# Altium PCB MainBoardPCB_5.PcbDoc (part 8 of 35)
Units mm, origin at the board's own origin, x right, y up, seen from the top; angles counter-clockwise.
Board outline 258.95 x 308.86 mm, 16 copper layers (L1, L2 (GND), L3 (Sign), L4 (GND), L5 (Sign), L6 (PWR/GND), L7(PWR/GND), L8 (Plane_GND), L9 (PWR/GND), L10 (PWR/GND), L11 (PWR/GND), L12 (Sign), L13 (GND), L14 (Sign), L15 (GND), L16), stack 2.502 mm thick; 2361 components, 1769 nets, 8410 pads, 3285 vias.
Unrouted connection lines stored in the file: 4635.
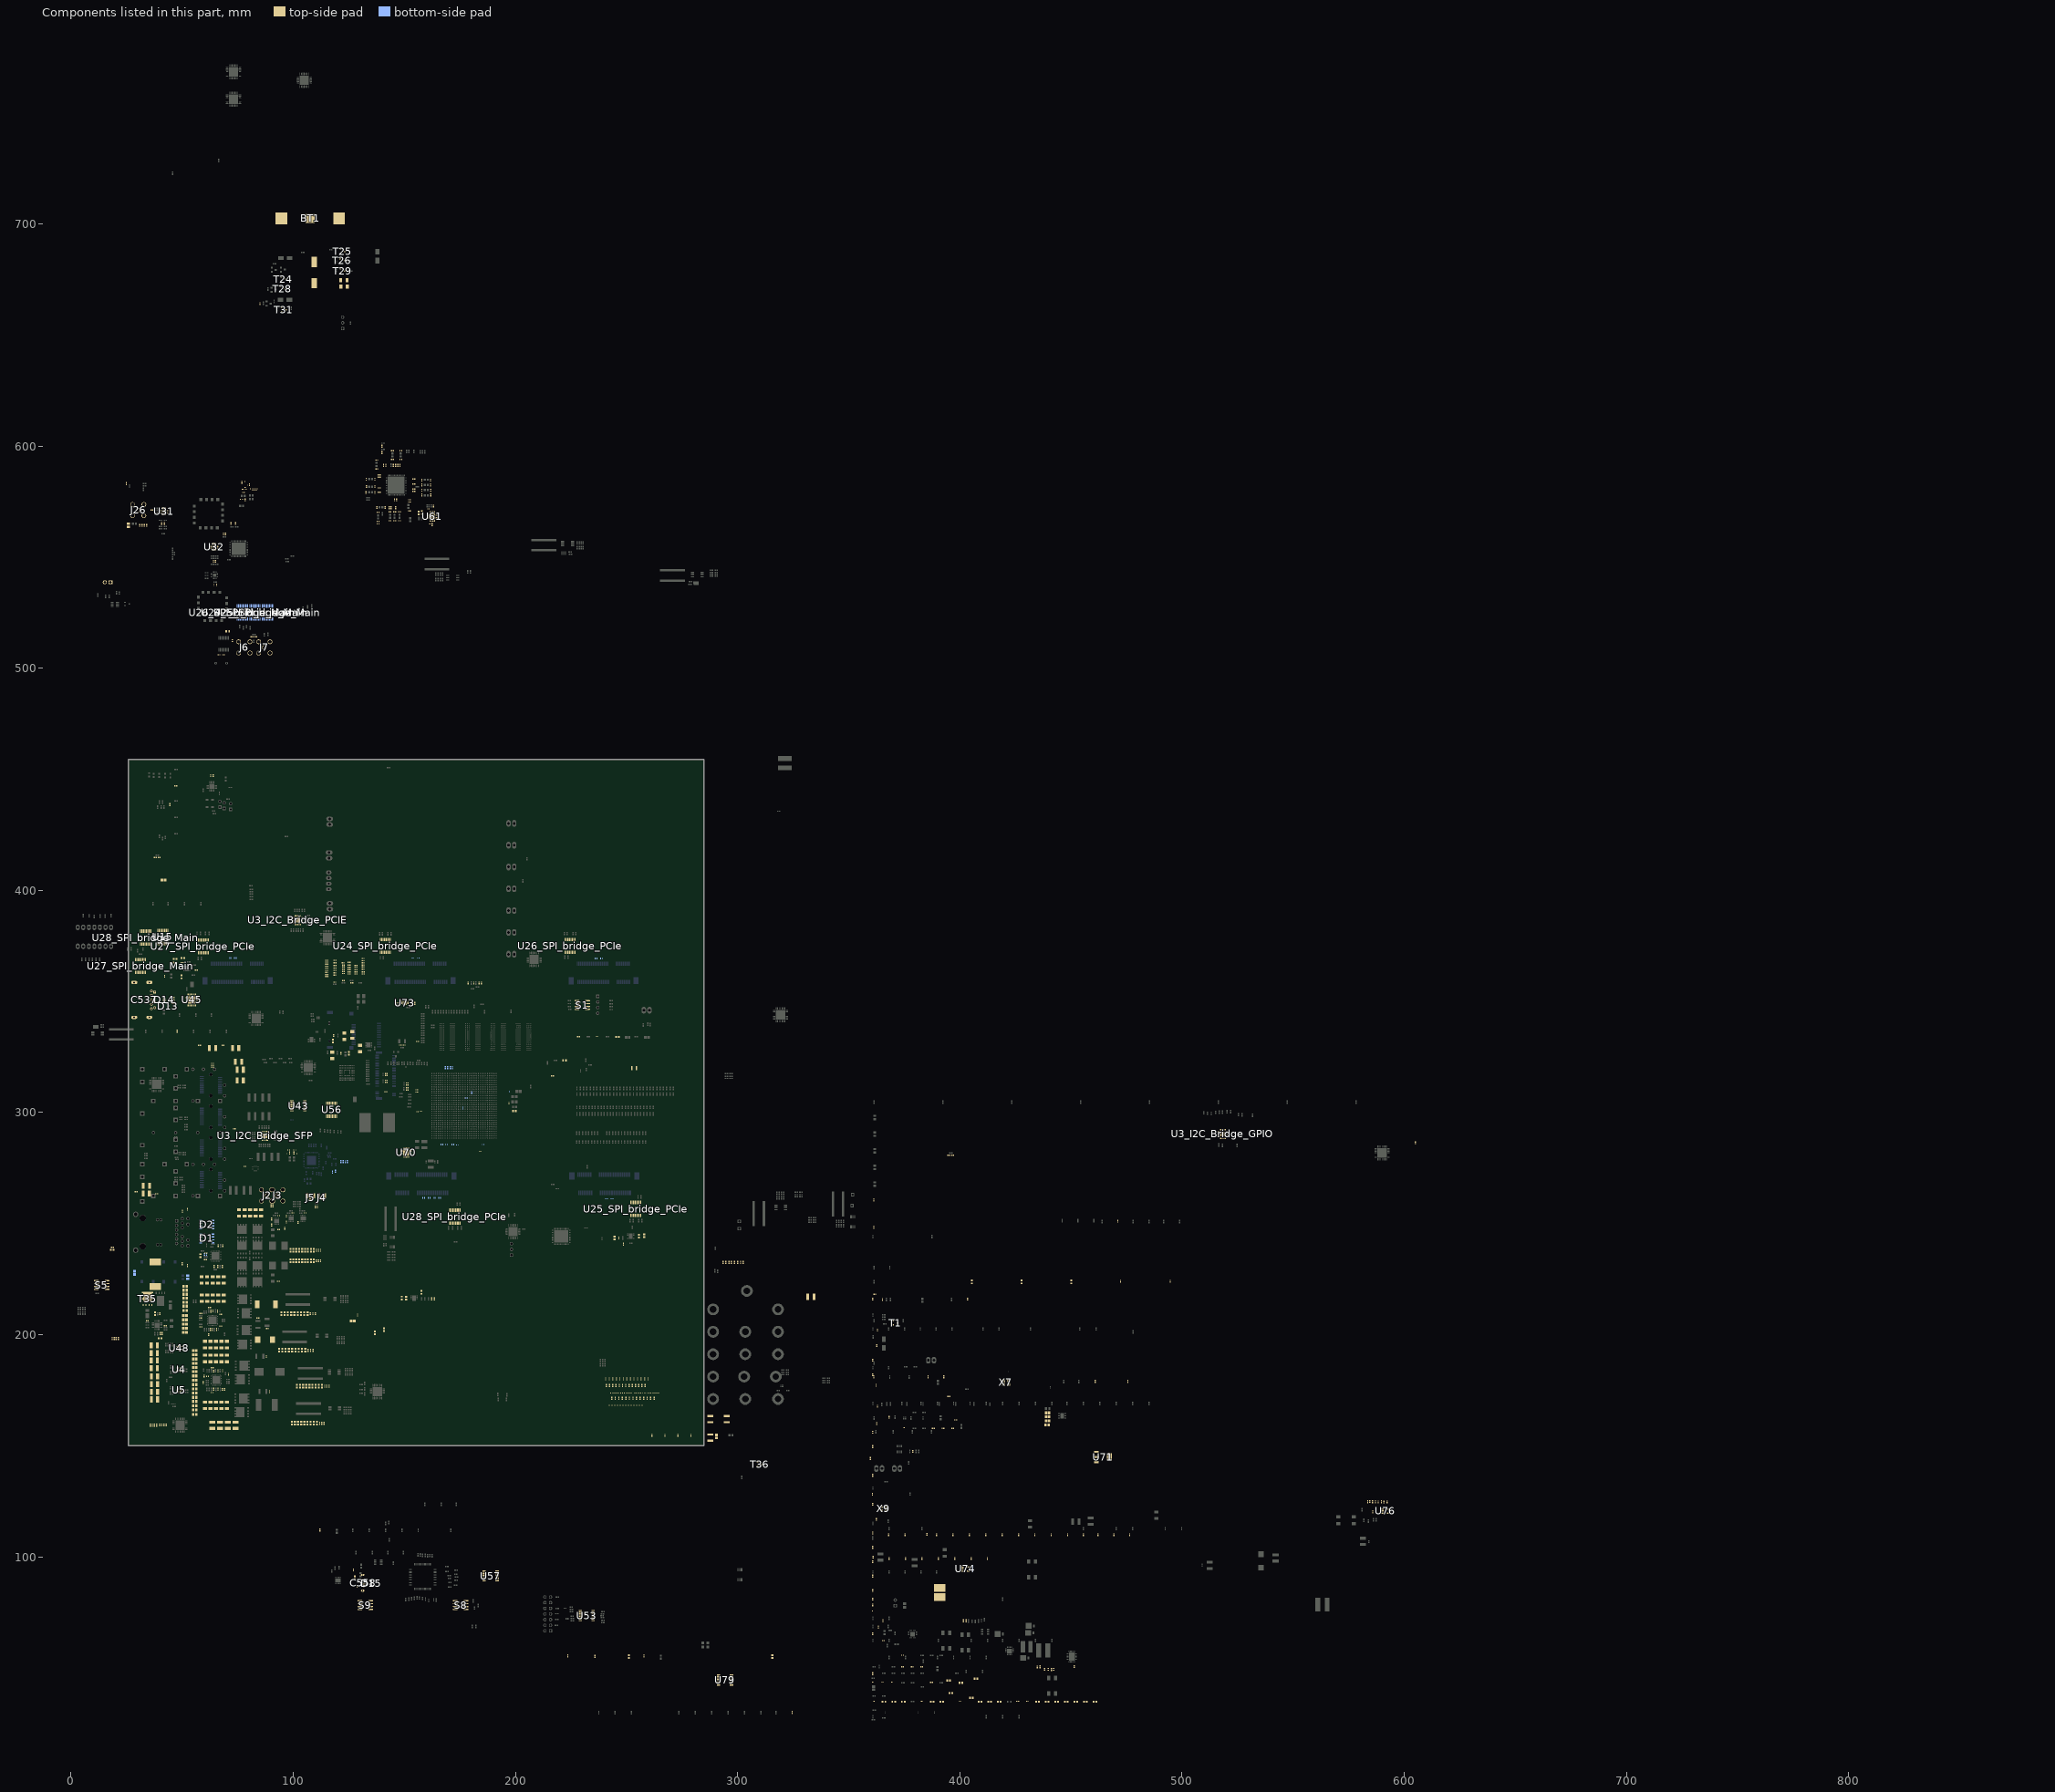
[diagram p19: the components of this part, seen from the top]

## Part data (continued)
C273 C276 C277 C278 C285 C288 C289 C290 C297 C300 C301 C302: library part Capacitor, "CAP CER 10000PF 16V X7R 0201", Dielectric=X7R, Manufacturer=Murata, Manufacturer Part Number=GRM033R71C103KE14D, Supplier Part Number 1=490-14453-1-ND, Tolerance=10%, Voltage Rating (DC)=16V, Capacitance=10nF, Category="Ceramic Capacitors", ComponentLink1Description=http://www.farnell.com/datasheets/2722745.pdf?src-supplier=Farnell, ComponentLink1URL=http://www.farnell.com/datasheets/2722745.pdf?src-supplier=Farnell, ComponentLink2Description=http://www.farnell.com/datasheets/2722745.pdf?src-supplier=Newark, ComponentLink2URL=http://www.farnell.com/datasheets/2722745.pdf?src-supplier=Newark, ComponentLink3Description=http://www.farnell.com/datasheets/2722745.pdf?src-supplier=Element14, ComponentLink3URL=http://www.farnell.com/datasheets/2722745.pdf?src-supplier=Element14, ComponentLink4Description=http://search.murata.co.jp/Ceramy/image/img/A01X/G101/ENG/GRM033R71C103KE14-01.pdf?src-supplier=Digi-Key, ComponentLink4URL=http://search.murata.co.jp/Ceramy/image/img/A01X/G101/ENG/GRM033R71C103KE14-01.pdf?src-supplier=Digi-Key, Length=600um, Pricing 1="1=0,10000, 10=0,01900, 100=0,00870, 500=0,00620, 1000=0,00487, 2500=0,00443, 5000=0,00407 (USD)", RoHS=No, Stock 1=188777, Supplier 1=Digi-Key, Thickness=300um, Width=300um
C303_I2C_Bridge_GPIO C303_I2C_Bridge_PCIE C303_I2C_Bridge_SFP C406 C418 C447 C459 C517 C519 C521 C545 C546 C547 C566_5V_to_3V3_for_FTDI C623 C649 C651 C653 C654 C677 C715 C716 C717 C718: library part Capacitor, Case/Package=0402, Case Code (Metric)=1005, Dielectric=X5R, Insulation Resistance=10GR, Manufacturer=Yageo, Manufacturer Part Number=CC0402KRX5R6BB104, Max Operating Temperature=85°C, Min Operating Temperature=-55°C, Package Quantity=1, Supplier Part Number 1=311-1336-1-ND, Tolerance=10%, Voltage Rating=10V, Capacitance=100nF, Case Code (Imperial)=0402, ComponentLink1Description=https://datasheet.ciiva.com/144/mlccorderingcode-144028.pdf?src-supplier=Digi-Key, ComponentLink1URL=https://datasheet.ciiva.com/144/mlccorderingcode-144028.pdf?src-supplier=Digi-Key, ComponentLink2Description=https://datasheet.ciiva.com/144/mlccorderingcode-144029.pdf?src-supplier=Digi-Key, ComponentLink2URL=https://datasheet.ciiva.com/144/mlccorderingcode-144029.pdf?src-supplier=Digi-Key, ComponentLink3Description=https://datasheet.ciiva.com/144/mlccorderingcode-144030.pdf?src-supplier=Digi-Key, ComponentLink3URL=https://datasheet.ciiva.com/144/mlccorderingcode-144030.pdf?src-supplier=Digi-Key, ComponentLink4Description=https://datasheet.ciiva.com/11587/upy-gphc-x5r-4v-to-50v-12-11587302.pdf?src-supplier=Avnet, ComponentLink4URL=https://datasheet.ciiva.com/11587/upy-gphc-x5r-4v-to-50v-12-11587302.pdf?src-supplier=Avnet, ComponentLink5Description=https://datasheet.ciiva.com/7978/1359354-7978091.pdf?src-supplier=Element14, ComponentLink5URL=https://datasheet.ciiva.com/7978/1359354-7978091.pdf?src-supplier=Element14, ComponentLink6Description=https://datasheet.ciiva.com/16624/upy-gphc-x5r-4v-to-50v-12-16624732.pdf?src-supplier=Avnet+Europe, ComponentLink6URL=https://datasheet.ciiva.com/16624/upy-gphc-x5r-4v-to-50v-12-16624732.pdf?src-supplier=Avnet+Europe, Depth=0.5mm, Dissipation Factor=5%, Halogen Free="Halogen Free", Height=0.5mm, Lead Free="Lead Free", Length=1mm, Mount="Surface Mount", Number of Pins=2, Packaging="Tape and Reel", Pricing 1="1 = 0,10000, 10 = 0,03000, 100 = 0,01350, 500 = 0,00966, 1000 = 0,00759, 2500 = 0,00690, 5000 = 0,00635 (USD)", Radiation Hardening=No, REACH SVHC="No SVHC", RoHS=Yes, Stock 1=8753233, Supplier 1=Digi-Key, Termination=SMD/SMT, Thickness=0.022inch, Voltage Rating (DC)=10V, Width=0.02inch
C304 C305 C306 C307: library part Capacitor, "SMT Capacitor", Part Number=CL10A475KO8NNNC, Supplier Part Number 1=1276-1784-2-ND, Parameter 1=16V, Supplier 1=Digi-Key
C308 C354 C355 C606 C607 C610 C611 C613 C614 C615 C617 C618 C619 C620 C621 C622: library part Capacitor, "SMT Capacitor", Part Number=CL10A475KQ8NNNC, Supplier Part Number 1=1276-1045-1-ND, Parameter 1=6.3V, Supplier 1=Digi-Key
C309_U_Pomiar_pradu_napiecia_1 C309_U_Pomiar_pradu_napiecia_2 C309_U_Pomiar_pradu_napiecia_3 C309_U_Pomiar_pradu_napiecia_4 C309_U_Pomiar_pradu_napiecia_5 C309_U_Pomiar_pradu_napiecia_6 C309_U_Pomiar_pradu_napiecia_7 C309_U_Pomiar_pradu_napiecia_8 C309_U_Pomiar_pradu_napiecia_9 C309_U_Pomiar_pradu_napiecia_10 C309_U_Pomiar_pradu_napiecia_11 C310 C585 C711 C712: library part Capacitor, "CAP CER 0.1UF 50V X5R 0402", Case/Package=0402, Case Code (Metric)=1005, Dielectric=X5R, Dielectric Material=Ceramic, Manufacturer=Murata, Manufacturer Part Number=GRM155R61H104KE14D, Max Operating Temperature=85°C, Min Operating Temperature=-55°C, Package Quantity=10000, Supplier Part Number 1=490-10697-1-ND, Tolerance=10%, Voltage=50V, Capacitance=100nF, Case Code (Imperial)=0402, Category="Ceramic Capacitors", ComponentLink1Description=http://www.farnell.com/datasheets/2079150.pdf?src-supplier=Farnell, ComponentLink1URL=http://www.farnell.com/datasheets/2079150.pdf?src-supplier=Farnell, ComponentLink2Description=http://www.mouser.com/ds/2/281/c02e-2905.pdf?src-supplier=Mouser, ComponentLink2URL=http://www.mouser.com/ds/2/281/c02e-2905.pdf?src-supplier=Mouser, ComponentLink3Description=http://www.farnell.com/datasheets/2079150.pdf?src-supplier=Element14, ComponentLink3URL=http://www.farnell.com/datasheets/2079150.pdf?src-supplier=Element14, ComponentLink4Description=http://search.murata.co.jp/Ceramy/image/img/A01X/G101/ENG/GRM155R61H104KE14-01.pdf?src-supplier=Digi-Key, ComponentLink4URL=http://search.murata.co.jp/Ceramy/image/img/A01X/G101/ENG/GRM155R61H104KE14-01.pdf?src-supplier=Digi-Key, Composition=Ceramic, Depth=0.5mm, Dissipation Factor=0.025%, Height=0.5mm, Lead Free="Lead Free", Length=1mm, Mount="Surface Mount", Packaging="Tape and Reel", Pricing 1="1=0,10000, 10=0,04600, 100=0,02050, 500=0,01464, 1000=0,01150, 2500=0,01045, 5000=0,00961 (USD)", REACH SVHC="No SVHC", RoHS=Yes, Stock 1=435607, Supplier 1=Digi-Key, Termination=SMD/SMT, Thickness=0.022inch, Voltage Rating=50V, Voltage Rating (DC)=50V, Weight=0.000212oz, Width=0.02inch
C311_I2C_Expander_00 C311_I2C_Expander_01 C311_I2C_Expander_02 C311_I2C_Expander_10 C311_I2C_Expander_11 C311_I2C_Expander_12 C311_I2C_Expander_16 C311_I2C_Expander_17 C311_I2C_Expander_18 C311_I2C_Expander_Main_Rst C311_I2C_Expander_PWR_CLK C311_I2C_Expander_PWR_Dist C311_I2C_Expander_SFP C544 C700 C720 C721 C722 C723: library part Capacitor, "MURATA - GRT155R61E105KE01D - SMD Multilayer Ceramic Capacitor, 1 µF, 25 V, 0402 [1005 Metric], ± 10%, X5R, GRT Series - SMD Multilayer Ceramic Capacitor, 1 µF, 25 V, 0402 [1005 Metric], ± 10%, X5R, GRT Series", Case/Package=0402, Case Code (Metric)=1005, Dielectric=X5R, Manufacturer=Murata, Manufacturer Part Number=GRT155R61E105KE01D, Max Operating Temperature=85°C, Min Operating Temperature=-55°C, Ratings=AEC-Q200, Supplier Part Number 1=490-12263-1-ND, Tolerance=10%, Voltage Rating=25V, Capacitance=1uF, Case Code (Imperial)=0402, Category="Ceramic Capacitors", ComponentLink1Description=http://www.farnell.com/datasheets/2165918.pdf?src-supplier=Farnell, ComponentLink1URL=http://www.farnell.com/datasheets/2165918.pdf?src-supplier=Farnell, ComponentLink2Description=http://search.murata.co.jp/Ceramy/image/img/A01X/G101/ENG/GRT155R61E105KE01-01.pdf?src-supplier=Digi-Key, ComponentLink2URL=http://search.murata.co.jp/Ceramy/image/img/A01X/G101/ENG/GRT155R61E105KE01-01.pdf?src-supplier=Digi-Key, ComponentLink3Description=http://www.farnell.com/datasheets/2165918.pdf?src-supplier=Element14, ComponentLink3URL=http://www.farnell.com/datasheets/2165918.pdf?src-supplier=Element14, Length=0.039inch, Mount="Surface Mount", Packaging="Tape and Reel", Pricing 1="1=0,18000, 10=0,12300, 100=0,06210, 500=0,04248, 1000=0,03758, 2500=0,03594, 5000=0,03268 (USD)", RoHS=Yes, Supplier 1=Digi-Key, Thickness=0.022inch, Voltage Rating (DC)=25V, Width=0.02inch
  C311_I2C_Expander_00 C311_I2C_Expander_01 C311_I2C_Expander_02 C311_I2C_Expander_10 C311_I2C_Expander_11 C311_I2C_Expander_12 C311_I2C_Expander_16 C311_I2C_Expander_17 C311_I2C_Expander_18 C311_I2C_Expander_Main_Rst C311_I2C_Expander_PWR_CLK C311_I2C_Expander_PWR_Dist C311_I2C_Expander_SFP C700 C720 C721 C722 C723: Stock 1=341453
  C544: Stock 1=415681
C320: library part Capacitor, Case/Package=0402, Case Code (Metric)=1005, Dielectric=X7R, Dielectric Material=Ceramic, Manufacturer=KEMET, Manufacturer Part Number=C0402C103K8RACAUTO, Max Operating Temperature=125°C, Min Operating Temperature=-55°C, Package Quantity=1, Ratings=AEC-Q200, Supplier Part Number 1=399-6827-1-ND, Tolerance=10%, Voltage Rating=10V, Capacitance=10nF, Case Code (Imperial)=0402, ComponentLink1Description=https://datasheet.ciiva.com/6255/datasheetpn-c0402c103k8racauto-6255096.pdf?src-supplier=Digi-Key, ComponentLink1URL=https://datasheet.ciiva.com/6255/datasheetpn-c0402c103k8racauto-6255096.pdf?src-supplier=Digi-Key, Length=0.039inch, Mount="Surface Mount", Packaging="Cut Tape", Pricing 1="1 = 0,10000, 10 = 0,06800, 100 = 0,03020, 500 = 0,02158, 1000 = 0,01695, 2500 = 0,01541, 5000 = 0,01418 (USD)", REACH SVHC="No SVHC", RoHS=Yes, Stock 1=59295, Supplier 1=Digi-Key, Thickness=0.022inch, Voltage Rating (DC)=10V, Width=0.02inch
C321: library part Capacitor, Case/Package=0603, Case Code (Metric)=1608, Manufacturer="Wurth Electronics", Manufacturer Part Number=885012006016, Max Operating Temperature=125°C, Min Operating Temperature=-55°C, Supplier Part Number 1=732-7759-1-ND, Tolerance=5%, Voltage Rating=10V, Capacitance=3.3nF, Case Code (Imperial)=0603, ComponentLink1Description=https://katalog.we-online.de/pbs/datasheet/885012006016.pdf?src-supplier=Digi-Key, ComponentLink1URL=https://katalog.we-online.de/pbs/datasheet/885012006016.pdf?src-supplier=Digi-Key, Length=0.063inch, Mount="Surface Mount", Packaging="Tape and Reel", Pricing 1="1 = 0,10000, 10 = 0,08500, 100 = 0,07590, 500 = 0,06712 (USD)", RoHS=Yes, Stock 1=3926, Supplier 1=Digi-Key, Thickness=0.034inch, Width=0.031inch
C322 C323: library part Capacitor, Case/Package=0402, Case Code (Metric)=1005, Dielectric=C0G, Dielectric Material=Ceramic, Manufacturer=KEMET, Manufacturer Part Number=C0402C270K5GACTU, Max Operating Temperature=125°C, Min Operating Temperature=-55°C, Package Quantity=1, Supplier Part Number 1=399-8960-1-ND, Tolerance=10%, Voltage Rating=50V, Capacitance=27pF, Case Code (Imperial)=0402, ComponentLink1Description=https://datasheet.ciiva.com/5413/kem-c1003-c0g-smd-5413929.pdf?src-supplier=Mouser, ComponentLink1URL=https://datasheet.ciiva.com/5413/kem-c1003-c0g-smd-5413929.pdf?src-supplier=Mouser, Depth=0.5mm, Height=0.5mm, Lead Free="Lead Free", Lead Pitch=0.3mm, Length=1mm, Mount="Surface Mount", Packaging="Tape and Reel", Pricing 1="1 = 0,10000, 10 = 0,02000, 100 = 0,00900, 500 = 0,00644, 1000 = 0,00506, 2500 = 0,00460, 5000 = 0,00423 (USD)", RoHS=Yes, Stock 1=1014365, Supplier 1=Digi-Key, Termination=SMD/SMT, Thickness=0.022inch, Voltage Rating (DC)=50V, Width=0.02inch
C324: library part Capacitor, Case/Package=0805, Case Code (Metric)=2012, Manufacturer=Samsung, Manufacturer Part Number=CL21A106KQCLRNC, Max Operating Temperature=85°C, Min Operating Temperature=-55°C, Package Quantity=1, Supplier Part Number 1=1276-2405-1-ND, Tolerance=10%, Voltage Rating=6.3V, Capacitance=10uF, Case Code (Imperial)=0805, ComponentLink1Description=https://datasheet.ciiva.com/25772/cl21a106kqclrnc-25772948.pdf?src-supplier=Digi-Key, ComponentLink1URL=https://datasheet.ciiva.com/25772/cl21a106kqclrnc-25772948.pdf?src-supplier=Digi-Key, Length=0.079inch, Mount="Surface Mount", Packaging="Tape and Reel", Pricing 1="1 = 0,12000, 10 = 0,08500, 100 = 0,03810, 500 = 0,02718, 1000 = 0,02136 (USD)", RoHS=Yes, Stock 1=41173, Supplier 1=Digi-Key, Thickness=0.037inch, Width=0.049inch
C325 C330 C334 C335 C342 C343: library part Capacitor, Case Code (Imperial)=0402, Case Code (Metric)=1005, Dielectric=X7R, Dielectric Material=Ceramic, Insulation Resistance=10GR, Manufacturer=Murata, Manufacturer Part Number=GRM155R71C104KA88D, Max Operating Temperature=125°C, Min Operating Temperature=-55°C, Package Quantity=1, Supplier Part Number 1=490-3261-6-ND, Tolerance=10%, Voltage=16V, Capacitance=100nF, Case/Package=0402, ComponentLink1Description=https://datasheet.ciiva.com/18102/getdatasheetpartid-85307-18102905.pdf?src-supplier=Verical, ComponentLink1URL=https://datasheet.ciiva.com/18102/getdatasheetpartid-85307-18102905.pdf?src-supplier=Verical, ComponentLink2Description=https://datasheet.ciiva.com/129/grm155r71c104ka88-01-129739.pdf?src-supplier=Digi-Key, ComponentLink2URL=https://datasheet.ciiva.com/129/grm155r71c104ka88-01-129739.pdf?src-supplier=Digi-Key, ComponentLink3Description=https://datasheet.ciiva.com/129/grm155r71c104ka88-01-129740.pdf?src-supplier=Digi-Key, ComponentLink3URL=https://datasheet.ciiva.com/129/grm155r71c104ka88-01-129740.pdf?src-supplier=Digi-Key, ComponentLink4Description=https://datasheet.ciiva.com/29199/454098-da-01-en-vs-kondensator-0402-29199799.pdf?src-supplier=Conrad, ComponentLink4URL=https://datasheet.ciiva.com/29199/454098-da-01-en-vs-kondensator-0402-29199799.pdf?src-supplier=Conrad, ComponentLink5Description=https://datasheet.ciiva.com/28534/4360-28534133.pdf?src-supplier=Element14, ComponentLink5URL=https://datasheet.ciiva.com/28534/4360-28534133.pdf?src-supplier=Element14, ComponentLink6Description=https://datasheet.ciiva.com/14103/grmseries-highdielectrictype-eng-14103750.pdf?src-supplier=Distrelec, ComponentLink6URL=https://datasheet.ciiva.com/14103/grmseries-highdielectrictype-eng-14103750.pdf?src-supplier=Distrelec, ComponentLink7Description=https://datasheet.ciiva.com/16199/product-16199000.pdf?src-supplier=Future+Electronics, ComponentLink7URL=https://datasheet.ciiva.com/16199/product-16199000.pdf?src-supplier=Future+Electronics, ComponentLink8Description=https://datasheet.ciiva.com/14116/grmseries-highdielectrictype-eng-14116878.pdf?src-supplier=Distrelec, ComponentLink8URL=https://datasheet.ciiva.com/14116/grmseries-highdielectrictype-eng-14116878.pdf?src-supplier=Distrelec, ComponentLink9Description=https://datasheet.ciiva.com/7937/4360-7937615.pdf?src-supplier=Element14, ComponentLink9URL=https://datasheet.ciiva.com/7937/4360-7937615.pdf?src-supplier=Element14, ComponentLink10Description=https://datasheet.ciiva.com/28534/4360-28534127.pdf?src-supplier=Element14, ComponentLink10URL=https://datasheet.ciiva.com/28534/4360-28534127.pdf?src-supplier=Element14, Depth=0.5mm, Height=0.5mm, Lead Free="Lead Free", Length=1mm, Material=Ceramic, Mount="Surface Mount", Number of Pins=2, Packaging="Tape and Reel", Pricing 1="1 = 0,10000, 10 = 0,03300, 100 = 0,01470, 500 = 0,01046, 1000 = 0,00822, 2500 = 0,00748, 5000 = 0,00688 (USD)", Radiation Hardening=No, REACH SVHC="No SVHC", RoHS=Yes, Stock 1=141102188, Supplier 1=Digi-Key, Termination=SMD/SMT, Thickness=0.022inch, Voltage Rating=16V, Voltage Rating (DC)=16V, Width=0.5mm
C326 C327 C328 C329: library part Capacitor, Case/Package=0402, Dielectric=X5R, Dielectric Material=Ceramic, Manufacturer=KEMET, Manufacturer Part Number=C0402C105K9PACTU, Max Operating Temperature=85°C, Min Operating Temperature=-55°C, Package Quantity=1, Supplier Part Number 1=399-4873-6-ND, Tolerance=10%, Voltage=6.3V, Capacitance=1uF, Case Code (Imperial)=0402, ComponentLink1Description=https://datasheet.ciiva.com/28645/1789732-28645392.pdf?src-supplier=Element14, ComponentLink1URL=https://datasheet.ciiva.com/28645/1789732-28645392.pdf?src-supplier=Element14, ComponentLink2Description=https://datasheet.ciiva.com/11786/0900766b8116eb59-11786028.pdf?src-supplier=RSComponents, ComponentLink2URL=https://datasheet.ciiva.com/11786/0900766b8116eb59-11786028.pdf?src-supplier=RSComponents, ComponentLink3Description=https://datasheet.ciiva.com/7747/kem-c1006-x5r-smd-7747445.pdf?src-supplier=Element14, ComponentLink3URL=https://datasheet.ciiva.com/7747/kem-c1006-x5r-smd-7747445.pdf?src-supplier=Element14, ComponentLink4Description=https://datasheet.ciiva.com/7747/40889-7747623.pdf?src-supplier=Element14, ComponentLink4URL=https://datasheet.ciiva.com/7747/40889-7747623.pdf?src-supplier=Element14, ComponentLink5Description=https://datasheet.ciiva.com/18192/getdatasheetpartid-127800-18192427.pdf?src-supplier=Verical, ComponentLink5URL=https://datasheet.ciiva.com/18192/getdatasheetpartid-127800-18192427.pdf?src-supplier=Verical, Depth=0.5mm, Height=0.5mm, Lead Free="Lead Free", Lead Pitch=0.3mm, Length=1mm, Mount="Surface Mount", Number of Pins=2, Packaging="Tape and Reel", Pricing 1="1 = 0,10000, 10 = 0,02600, 100 = 0,01180, 500 = 0,00844, 1000 = 0,00662, 2500 = 0,00602, 5000 = 0,00554 (USD)", Radiation Hardening=No, REACH SVHC="No SVHC", RoHS=Yes, Stock 1=1776522, Supplier 1=Digi-Key, Termination=SMD/SMT, Thickness=0.022inch, Voltage Rating=6.3V, Voltage Rating (DC)=6.3V, Width=0.02inch
C331 C332 C395 C398 C408 C420 C436 C439 C449 C461 C522 C538 C559 C733 C734: library part Capacitor, Case/Package=0402, Case Code (Metric)=1005, Dielectric=X5R, Manufacturer=Yageo, Manufacturer Part Number=CC0402KRX5R6BB105, Max Operating Temperature=85°C, Min Operating Temperature=-55°C, Package Quantity=1, Supplier Part Number 1=311-1439-1-ND, Tolerance=10%, Voltage Rating=10V, Capacitance=1uF, Case Code (Imperial)=0402, ComponentLink1Description=https://datasheet.ciiva.com/176/upy-gphc-x5r-4v-to-50v-12-176704.pdf?src-supplier=Digi-Key, ComponentLink1URL=https://datasheet.ciiva.com/176/upy-gphc-x5r-4v-to-50v-12-176704.pdf?src-supplier=Digi-Key, ComponentLink2Description=https://datasheet.ciiva.com/176/mlccorderingcode-176705.pdf?src-supplier=Digi-Key, ComponentLink2URL=https://datasheet.ciiva.com/176/mlccorderingcode-176705.pdf?src-supplier=Digi-Key, ComponentLink3Description=https://datasheet.ciiva.com/176/mlccorderingcode-176706.pdf?src-supplier=Digi-Key, ComponentLink3URL=https://datasheet.ciiva.com/176/mlccorderingcode-176706.pdf?src-supplier=Digi-Key, Composition=Ceramic, Depth=0.5mm, Dissipation Factor=15%, Halogen Free="Halogen Free", Height=0.5mm, Lead Free="Lead Free", Length=1mm, Mount="Surface Mount", Number of Pins=2, Packaging="Tape and Reel", Pricing 1="1 = 0,10000, 10 = 0,06300, 100 = 0,02790, 500 = 0,01996, 1000 = 0,01568, 2500 = 0,01425, 5000 = 0,01311 (USD)", Radiation Hardening=No, REACH SVHC="No SVHC", RoHS=Yes, Stock 1=6046339, Supplier 1=Digi-Key, Termination=SMD/SMT, Thickness=0.022inch, Voltage Rating (DC)=10V, Width=0.02inch
C339: library part Capacitor, Case Code (Imperial)=0805, Case Code (Metric)=2012, Manufacturer=Samsung, Manufacturer Part Number=CL21A106KQCLRNC, Max Operating Temperature=85°C, Min Operating Temperature=-55°C, Package Quantity=1, Supplier Part Number 1=1276-2405-1-ND, Tolerance=10%, Voltage Rating=6.3V, Capacitance=10uF, Case/Package=0805, ComponentLink1Description=https://datasheet.ciiva.com/25772/cl21a106kqclrnc-25772948.pdf?src-supplier=Digi-Key, ComponentLink1URL=https://datasheet.ciiva.com/25772/cl21a106kqclrnc-25772948.pdf?src-supplier=Digi-Key, Length=0.079inch, Mount="Surface Mount", Packaging="Tape and Reel", Pricing 1="1 = 0,12000, 10 = 0,08500, 100 = 0,03810, 500 = 0,02718, 1000 = 0,02136 (USD)", RoHS=Yes, Stock 1=41173, Supplier 1=Digi-Key, Thickness=0.037inch, Width=0.049inch
C345 C349 C535 C536: library part Capacitor, Case Code (Imperial)=0402, Case Code (Metric)=1005, Dielectric=C0G, Manufacturer="Kyocera AVX", Manufacturer Part Number=04025A220JAT2A, Max Operating Temperature=125°C, Min Operating Temperature=-55°C, Package Quantity=1, Supplier Part Number 1=478-1074-1-ND, Temperature Coefficient=30ppm/°C, Tolerance=5%, Voltage=50V, Capacitance=22pF, Case/Package=0402, ComponentLink1Description=https://datasheet.ciiva.com/11787/0900766b80def0e2-11787300.pdf?src-supplier=RSComponents, ComponentLink1URL=https://datasheet.ciiva.com/11787/0900766b80def0e2-11787300.pdf?src-supplier=RSComponents, ComponentLink2Description=https://datasheet.ciiva.com/39121/2009578-39121644.pdf?src-supplier=Jameco, ComponentLink2URL=https://datasheet.ciiva.com/39121/2009578-39121644.pdf?src-supplier=Jameco, ComponentLink3Description=https://datasheet.ciiva.com/1123/ccog-1123585.pdf?src-supplier=Element14, ComponentLink3URL=https://datasheet.ciiva.com/1123/ccog-1123585.pdf?src-supplier=Element14, ComponentLink4Description=https://datasheet.ciiva.com/1123/ccog-1123586.pdf?src-supplier=Element14, ComponentLink4URL=https://datasheet.ciiva.com/1123/ccog-1123586.pdf?src-supplier=Element14, ComponentLink5Description=https://datasheet.ciiva.com/150/ccog-150515.pdf?src-supplier=Digi-Key, ComponentLink5URL=https://datasheet.ciiva.com/150/ccog-150515.pdf?src-supplier=Digi-Key, ComponentLink6Description=https://datasheet.ciiva.com/150/ccog-150516.pdf?src-supplier=Digi-Key, ComponentLink6URL=https://datasheet.ciiva.com/150/ccog-150516.pdf?src-supplier=Digi-Key, ComponentLink7Description=https://datasheet.ciiva.com/150/ccog-150517.pdf?src-supplier=Digi-Key, ComponentLink7URL=https://datasheet.ciiva.com/150/ccog-150517.pdf?src-supplier=Digi-Key, ComponentLink8Description=https://datasheet.ciiva.com/2987/ccog-2987653.pdf?src-supplier=Avnet, ComponentLink8URL=https://datasheet.ciiva.com/2987/ccog-2987653.pdf?src-supplier=Avnet, ComponentLink9Description=https://datasheet.ciiva.com/2987/ccog-2987654.pdf?src-supplier=Avnet, ComponentLink9URL=https://datasheet.ciiva.com/2987/ccog-2987654.pdf?src-supplier=Avnet, ComponentLink10Description=https://datasheet.ciiva.com/5423/ccog-243403-5423927.pdf?src-supplier=Mouser, ComponentLink10URL=https://datasheet.ciiva.com/5423/ccog-243403-5423927.pdf?src-supplier=Mouser, ComponentLink11Description=https://datasheet.ciiva.com/16218/ccog-16218185.pdf?src-supplier=Future+Electronics, ComponentLink11URL=https://datasheet.ciiva.com/16218/ccog-16218185.pdf?src-supplier=Future+Electronics, ComponentLink12Description=https://datasheet.ciiva.com/28592/759117-28592746.pdf?src-supplier=Element14, ComponentLink12URL=https://datasheet.ciiva.com/28592/759117-28592746.pdf?src-supplier=Element14, ComponentLink13Description=https://datasheet.ciiva.com/15165/getdatasheetpartid-38041-15165131.pdf?src-supplier=Verical, ComponentLink13URL=https://datasheet.ciiva.com/15165/getdatasheetpartid-38041-15165131.pdf?src-supplier=Verical, Contact Plating=Tin,Matte, Depth=0.5mm, Height=0.5mm, Lead Free="Lead Free", Length=1mm, Mount="Surface Mount", Number of Pins=2, Packaging="Tape and Reel", Pricing 1="1 = 0,10000, 10 = 0,03500, 100 = 0,01550, 500 = 0,01108, 1000 = 0,00871, 2500 = 0,00792, 5000 = 0,00729 (USD)", Radiation Hardening=No, REACH SVHC="No SVHC", RoHS=Yes, Stock 1=1489814, Supplier 1=Digi-Key, Termination=SMD/SMT, Thickness=0.022inch, Voltage Rating=50V, Voltage Rating (DC)=50V, Width=0.02inch
C346 C350 C713: library part Capacitor, Case Code (Imperial)=0402, Case Code (Metric)=1005, Dielectric=X5R, Manufacturer=Multicomp, Manufacturer Part Number=MC0402X104K160CT, Max Operating Temperature=85°C, Min Operating Temperature=-55°C, Supplier Part Number 1=2310529, Tolerance=10%, Voltage Rating=16V, Capacitance=100nF, Case/Package=0402, ComponentLink1Description=https://datasheet.ciiva.com/22648/1901289-22648380.pdf?src-supplier=Element14, ComponentLink1URL=https://datasheet.ciiva.com/22648/1901289-22648380.pdf?src-supplier=Element14, ComponentLink2Description=https://datasheet.ciiva.com/22648/1901289-22648381.pdf?src-supplier=Element14, ComponentLink2URL=https://datasheet.ciiva.com/22648/1901289-22648381.pdf?src-supplier=Element14, ComponentLink3Description=https://datasheet.ciiva.com/22686/1901289-22686271.pdf?src-supplier=Element14, ComponentLink3URL=https://datasheet.ciiva.com/22686/1901289-22686271.pdf?src-supplier=Element14, Number of Pins=2, Packaging="Cut Tape", REACH SVHC=Unknown, RoHS=Yes, Stock 1=510000, Supplier 1=Farnell, Voltage Rating (DC)=16V
C347 C348 C352 C353 C391 C392 C396 C397 C432 C433 C437 C438: library part Capacitor, Case/Package=1206, Case Code (Metric)=3216, Dielectric=X7R, Manufacturer 1=Murata, Manufacturer Part Number 1=GRM31CR71E106MA12L, Max Operating Temperature=125°C, Min Operating Temperature=-55°C, Package Quantity=1, Supplier Part Number 1=490-6519-1-ND, Tolerance=20%, Voltage=25V, Capacitance=10uF, Case Code (Imperial)=1206, ComponentLink1Description=https://datasheet.ciiva.com/11607/product-11607561.pdf?src-supplier=Avnet, ComponentLink1URL=https://datasheet.ciiva.com/11607/product-11607561.pdf?src-supplier=Avnet, ComponentLink2Description=https://datasheet.ciiva.com/5412/product-5412861.pdf?src-supplier=Mouser, ComponentLink2URL=https://datasheet.ciiva.com/5412/product-5412861.pdf?src-supplier=Mouser, ComponentLink3Description=https://datasheet.ciiva.com/6264/partnumbering-e-01-6264463.pdf?src-supplier=Digi-Key, ComponentLink3URL=https://datasheet.ciiva.com/6264/partnumbering-e-01-6264463.pdf?src-supplier=Digi-Key, Depth=1.6mm, Height=1.6mm, Lead Free="Lead Free", Length=3.2mm, Mount="Surface Mount", Packaging="Tape and Reel", Pricing 1="1=0,79000, 10=0,59800, 100=0,42750, 500=0,33098, 1000=0,28501 (USD)", Radiation Hardening=No, REACH SVHC="No SVHC", RoHS=Yes, Stock 1=9864, Supplier 1=Digi-Key, Termination=SMD/SMT, Thickness=0.071inch, Voltage Rating=25V, Voltage Rating (DC)=25V, Width=0.063inch
C351 C356 C361 C379 C680: library part Capacitor, Case Code (Imperial)=0402, Case Code (Metric)=1005, Dielectric=X5R, Manufacturer=Yageo, Manufacturer Part Number=CC0402KRX5R6BB105, Max Operating Temperature=85°C, Min Operating Temperature=-55°C, Package Quantity=1, Supplier Part Number 1=311-1439-1-ND, Tolerance=10%, Voltage Rating=10V, Capacitance=1uF, Case/Package=0402, ComponentLink1Description=https://datasheet.ciiva.com/176/upy-gphc-x5r-4v-to-50v-12-176704.pdf?src-supplier=Digi-Key, ComponentLink1URL=https://datasheet.ciiva.com/176/upy-gphc-x5r-4v-to-50v-12-176704.pdf?src-supplier=Digi-Key, ComponentLink2Description=https://datasheet.ciiva.com/176/mlccorderingcode-176705.pdf?src-supplier=Digi-Key, ComponentLink2URL=https://datasheet.ciiva.com/176/mlccorderingcode-176705.pdf?src-supplier=Digi-Key, ComponentLink3Description=https://datasheet.ciiva.com/176/mlccorderingcode-176706.pdf?src-supplier=Digi-Key, ComponentLink3URL=https://datasheet.ciiva.com/176/mlccorderingcode-176706.pdf?src-supplier=Digi-Key, Composition=Ceramic, Depth=0.5mm, Dissipation Factor=15%, Halogen Free="Halogen Free", Height=0.5mm, Lead Free="Lead Free", Length=1mm, Mount="Surface Mount", Number of Pins=2, Packaging="Tape and Reel", Pricing 1="1 = 0,10000, 10 = 0,06300, 100 = 0,02790, 500 = 0,01996, 1000 = 0,01568, 2500 = 0,01425, 5000 = 0,01311 (USD)", Radiation Hardening=No, REACH SVHC="No SVHC", RoHS=Yes, Stock 1=6046339, Supplier 1=Digi-Key, Termination=SMD/SMT, Thickness=0.022inch, Voltage Rating (DC)=10V, Width=0.02inch
C357 C399 C440: library part Capacitor, Case/Package=0402, Case Code (Metric)=1005, Dielectric=X5R, Dielectric Material=Ceramic, Manufacturer 1=KEMET, Manufacturer Part Number 1=C0402C104M8PACTU, Max Operating Temperature=85°C, Min Operating Temperature=-55°C, Package Quantity=1, Supplier Part Number 1=399-7764-1-ND, Tolerance=20%, Voltage=10V, Capacitance=100nF, Case Code (Imperial)=0402, ComponentLink1Description=https://datasheet.ciiva.com/5416/kem-c1006-x5r-smd-5416719.pdf?src-supplier=Mouser, ComponentLink1URL=https://datasheet.ciiva.com/5416/kem-c1006-x5r-smd-5416719.pdf?src-supplier=Mouser, Depth=0.5mm, Dissipation Factor=5%, Height=0.5mm, Lead Free="Lead Free", Lead Pitch=0.3mm, Length=1mm, Mount="Surface Mount,PCB", Number of Pins=2, Packaging="Tape and Reel", Pricing 1="1=0,10000, 10=0,02800, 100=0,01240, 500=0,00886, 1000=0,00696, 2500=0,00632, 5000=0,00582 (USD)", REACH SVHC="No SVHC", RoHS=Yes, Stock 1=344454, Supplier 1=Digi-Key, Termination=SMD/SMT, Thickness=0.022inch, Voltage Rating=10V, Voltage Rating (DC)=10V, Width=0.02inch
C358: library part Capacitor, "Cap Ceramic 1uF 10V X5R 10% SMD 0603 85C Paper T/R", Case Code (Imperial)=0603, Case Code (Metric)=1608, Dielectric=X5R, Manufacturer=Samsung, Manufacturer Part Number=CL10A105KP8NNNC, Max Operating Temperature=85°C, Min Operating Temperature=-55°C, Package Quantity=1, Supplier Part Number 1=1276-1182-1-ND, Tolerance=10%, Voltage=10V, Capacitance=1uF, Case/Package=0603, Category="Ceramic Capacitors", ComponentLink1Description=https://datasheet.ciiva.com/15195/getdatasheetpartid-358616-15195708.pdf?src-supplier=Verical, ComponentLink1URL=https://datasheet.ciiva.com/15195/getdatasheetpartid-358616-15195708.pdf?src-supplier=Verical, ComponentLink2Description=https://datasheet.ciiva.com/16358/cl05b104kq5nnnc-16358431.pdf?src-supplier=Future+Electronics, ComponentLink2URL=https://datasheet.ciiva.com/16358/cl05b104kq5nnnc-16358431.pdf?src-supplier=Future+Electronics, Contact Plating=Tin, Depth=0.8mm, Height=0.8mm, Length=1.6mm, Mount="Surface Mount", Packaging="Tape and Reel", Pricing 1="1=0,10000, 10=0,03600, 100=0,01610, 500=0,01152, 1000=0,00905 (USD)", Radiation Hardening=No, RoHS=Yes, Stock 1=3646234, Supplier 1=Digi-Key, Thickness=0.035inch, Voltage Rating=10V, Width=0.031inch
C360 C378: library part Capacitor, Case Code (Imperial)=0402, Case Code (Metric)=1005, Dielectric=X5R, Manufacturer=Samsung, Manufacturer Part Number=CL05A474KP5NNNC, Max Operating Temperature=85°C, Min Operating Temperature=-55°C, Supplier Part Number 1=1276-1173-1-ND, Tolerance=10%, Voltage Rating=10V, Capacitance=470nF, Case/Package=0402, ComponentLink1Description=https://datasheet.ciiva.com/25710/cl05a474kp5nnnc-25710324.pdf?src-supplier=Digi-Key, ComponentLink1URL=https://datasheet.ciiva.com/25710/cl05a474kp5nnnc-25710324.pdf?src-supplier=Digi-Key, ComponentLink2Description=https://datasheet.ciiva.com/26838/getdatasheetpartid-355286-26838191.pdf?src-supplier=Verical, ComponentLink2URL=https://datasheet.ciiva.com/26838/getdatasheetpartid-355286-26838191.pdf?src-supplier=Verical, ComponentLink3Description=https://datasheet.ciiva.com/16437/cl05b104kq5nnnc-16437351.pdf?src-supplier=Future+Electronics, ComponentLink3URL=https://datasheet.ciiva.com/16437/cl05b104kq5nnnc-16437351.pdf?src-supplier=Future+Electronics, Depth=0.5mm, Height=0.5mm, Lead Free="Lead Free", Length=1mm, Mount="Surface Mount", Packaging="Tape and Reel", Pricing 1="1 = 0,10000, 10 = 0,07000, 100 = 0,03140, 500 = 0,02240, 1000 = 0,01761, 2500 = 0,01600, 5000 = 0,01472 (USD)", Radiation Hardening=No, RoHS=Yes, Stock 1=941442, Supplier 1=Digi-Key, Thickness=0.022inch, Voltage Rating (DC)=10V, Width=0.02inch
C362 C380 C563_U_5V_to_3V31 C563_U_5V_to_3V32 C563_U_5V_to_3V33 C564_U_5V_to_3V31 C564_U_5V_to_3V32 C564_U_5V_to_3V33 C565_U_5V_to_3V31 C565_U_5V_to_3V32 C565_U_5V_to_3V33: library part Capacitor, Case Code (Imperial)=0603, Case Code (Metric)=1608, Dielectric=X5R, Manufacturer=Samsung, Manufacturer Part Number=CL10A475KP8NNNC, Max Operating Temperature=85°C, Min Operating Temperature=-55°C, Package Quantity=1, Supplier Part Number 1=1276-1044-1-ND, Tolerance=10%, Voltage Rating=10V, Capacitance=4.7uF, Case/Package=0603, ComponentLink1Description=https://datasheet.ciiva.com/25797/cl10a475kp8nnnc-25797520.pdf?src-supplier=Digi-Key, ComponentLink1URL=https://datasheet.ciiva.com/25797/cl10a475kp8nnnc-25797520.pdf?src-supplier=Digi-Key, ComponentLink2Description=https://datasheet.ciiva.com/26838/getdatasheetpartid-358676-26838384.pdf?src-supplier=Verical, ComponentLink2URL=https://datasheet.ciiva.com/26838/getdatasheetpartid-358676-26838384.pdf?src-supplier=Verical, ComponentLink3Description=https://datasheet.ciiva.com/16318/cl05b104kq5nnnc-16318245.pdf?src-supplier=Future+Electronics, ComponentLink3URL=https://datasheet.ciiva.com/16318/cl05b104kq5nnnc-16318245.pdf?src-supplier=Future+Electronics, Contact Plating=Tin, Depth=0.8mm, Height=0.8mm, Length=1.6mm, Mount="Surface Mount", Packaging="Tape and Reel", Pricing 1="1 = 0,13000, 10 = 0,09600, 100 = 0,04520, 500 = 0,03168, 1000 = 0,02622 (USD)", Radiation Hardening=No, RoHS=Yes, Stock 1=2124648, Supplier 1=Digi-Key, Thickness=0.035inch, Width=0.031inch
C363 C365 C367 C369 C381 C383 C385 C387 C572 C576 C598 C631: library part Capacitor, Case Code (Imperial)=0603, Case Code (Metric)=1608, Dielectric=X5R, Manufacturer=Murata, Manufacturer Part Number=GRM188R61A106KE69D, Max Operating Temperature=85°C, Min Operating Temperature=-55°C, Supplier Part Number 1=490-10474-1-ND, Tolerance=10%, Voltage=10V, Capacitance=10uF, Case/Package=0603, ComponentLink1Description=http://components.arrow.com/part/dataview/0323_07281717?src-supplier=Arrow+Europe, ComponentLink1URL=http://components.arrow.com/part/dataview/0323_07281717?src-supplier=Arrow+Europe, ComponentLink2Description=http://www.farnell.com/datasheets/1955682.pdf?src-supplier=Farnell, ComponentLink2URL=http://www.farnell.com/datasheets/1955682.pdf?src-supplier=Farnell, ComponentLink3Description=http://www.mouser.com/ds/2/281/c02e-2905.pdf?src-supplier=Mouser, ComponentLink3URL=http://www.mouser.com/ds/2/281/c02e-2905.pdf?src-supplier=Mouser, ComponentLink4Description=http://search.murata.co.jp/Ceramy/image/img/A01X/G101/ENG/GRM188R61A106KE69-01.pdf?src-supplier=Digi-Key, ComponentLink4URL=http://search.murata.co.jp/Ceramy/image/img/A01X/G101/ENG/GRM188R61A106KE69-01.pdf?src-supplier=Digi-Key, ComponentLink5Description=http://www.farnell.com/datasheets/1955682.pdf?src-supplier=Element14, ComponentLink5URL=http://www.farnell.com/datasheets/1955682.pdf?src-supplier=Element14, ComponentLink6Description=http://www.farnell.com/datasheets/1955682.pdf?src-supplier=Newark, ComponentLink6URL=http://www.farnell.com/datasheets/1955682.pdf?src-supplier=Newark, ComponentLink7Description=http://psearch.en.murata.com/capacitor/product/GRM188R61A106KE69%23.pdf?src-supplier=Avnet, ComponentLink7URL=http://psearch.en.murata.com/capacitor/product/GRM188R61A106KE69%23.pdf?src-supplier=Avnet, Depth=0.8mm, Height=0.8mm, Lead Free="Lead Free", Length=1.6mm, Mount="Surface Mount", Packaging="Tape and Reel", Pricing 1="1 = 0,21000, 10 = 0,14000, 100 = 0,07110, 500 = 0,04864, 1000 = 0,04303 (USD)", REACH SVHC="No SVHC", RoHS=Yes, Stock 1=4597169, Supplier 1=Digi-Key, Thickness=0.037inch, Voltage Rating=10V, Voltage Rating (DC)=10V, Width=0.031inch
C364 C366 C368 C370 C382 C384 C386 C388: library part Capacitor, Case Code (Imperial)=0603, Case Code (Metric)=1608, Dielectric=X5R, Manufacturer=Murata, Manufacturer Part Number=GRM188R61A226ME15D, Max Operating Temperature=85°C, Min Operating Temperature=-55°C, Package Quantity=4000, Supplier Part Number 1=490-10476-1-ND, Tolerance=20%, Voltage Rating=10V, Capacitance=22uF, Case/Package=0603, ComponentLink1Description=https://datasheet.ciiva.com/46444/1769893-46444975.pdf?src-supplier=Element14, ComponentLink1URL=https://datasheet.ciiva.com/46444/1769893-46444975.pdf?src-supplier=Element14, Depth=0.8mm, Height=0.8mm, Lead Free="Lead Free", Length=1.6mm, Material=Ceramic, Mount="Surface Mount", Packaging="Tape and Reel", Pricing 1="1 = 0,31000, 10 = 0,21500, 100 = 0,12160, 500 = 0,08584, 1000 = 0,07512 (USD)", REACH SVHC="No SVHC", RoHS=Yes, Stock 1=1768748, Supplier 1=Digi-Key, Termination=SMD/SMT, Thickness=0.039inch, Voltage Rating (DC)=10V, Weight=0.000222oz, Width=0.8mm
C371 C372 C373 C374 C375 C376: library part Capacitor, "Cap Ceramic 10uF 25V X5R 10% SMD 1206 85C Embossed T/R", Case Code (Imperial)=1206, Case Code (Metric)=3216, Dielectric=X5R, Manufacturer=Samsung, Manufacturer Part Number=CL31A106KAHNNNE, Max Operating Temperature=85°C, Min Operating Temperature=-55°C, Supplier Part Number 1=1276-1075-1-ND, Tolerance=10%, Voltage=25V, Capacitance=10uF, Case/Package=1206, Category="Ceramic Capacitors", ComponentLink1Description=https://datasheet.ciiva.com/25710/cl31a106kahnnne-25710837.pdf?src-supplier=Digi-Key, ComponentLink1URL=https://datasheet.ciiva.com/25710/cl31a106kahnnne-25710837.pdf?src-supplier=Digi-Key, ComponentLink2Description=https://datasheet.ciiva.com/15195/getdatasheetpartid-355210-15195990.pdf?src-supplier=Verical, ComponentLink2URL=https://datasheet.ciiva.com/15195/getdatasheetpartid-355210-15195990.pdf?src-supplier=Verical, ComponentLink3Description=https://datasheet.ciiva.com/29201/452519-da-01-en-vs-kondensator-1206-29201124.pdf?src-supplier=Conrad, ComponentLink3URL=https://datasheet.ciiva.com/29201/452519-da-01-en-vs-kondensator-1206-29201124.pdf?src-supplier=Conrad, Contact Plating=Tin, Depth=1.6mm, Height=1.6mm, Lead Free="Lead Free", Length=3.2mm, Material=Ceramic, Mount="Surface Mount", Packaging="Tape and Reel", Pricing 1="1=0,22000, 10=0,15000, 100=0,07600, 500=0,05200, 1000=0,04600 (USD)", Radiation Hardening=No, RoHS=Yes, Stock 1=791813, Supplier 1=Digi-Key, Thickness=0.071inch, Voltage Rating=25V, Voltage Rating (DC)=25V, Width=0.063inch
C389 C393 C430 C434: library part Capacitor, Case/Package=0402, Case Code (Metric)=1005, Dielectric=C0G, Manufacturer="Kyocera AVX", Manufacturer Part Number=04025A220JAT2A, Max Operating Temperature=125°C, Min Operating Temperature=-55°C, Package Quantity=1, Supplier Part Number 1=478-1074-1-ND, Temperature Coefficient=30ppm/°C, Tolerance=5%, Voltage=50V, Capacitance=22pF, Case Code (Imperial)=0402, ComponentLink1Description=https://datasheet.ciiva.com/11787/0900766b80def0e2-11787300.pdf?src-supplier=RSComponents, ComponentLink1URL=https://datasheet.ciiva.com/11787/0900766b80def0e2-11787300.pdf?src-supplier=RSComponents, ComponentLink2Description=https://datasheet.ciiva.com/39121/2009578-39121644.pdf?src-supplier=Jameco, ComponentLink2URL=https://datasheet.ciiva.com/39121/2009578-39121644.pdf?src-supplier=Jameco, ComponentLink3Description=https://datasheet.ciiva.com/1123/ccog-1123585.pdf?src-supplier=Element14, ComponentLink3URL=https://datasheet.ciiva.com/1123/ccog-1123585.pdf?src-supplier=Element14, ComponentLink4Description=https://datasheet.ciiva.com/1123/ccog-1123586.pdf?src-supplier=Element14, ComponentLink4URL=https://datasheet.ciiva.com/1123/ccog-1123586.pdf?src-supplier=Element14, ComponentLink5Description=https://datasheet.ciiva.com/150/ccog-150515.pdf?src-supplier=Digi-Key, ComponentLink5URL=https://datasheet.ciiva.com/150/ccog-150515.pdf?src-supplier=Digi-Key, ComponentLink6Description=https://datasheet.ciiva.com/150/ccog-150516.pdf?src-supplier=Digi-Key, ComponentLink6URL=https://datasheet.ciiva.com/150/ccog-150516.pdf?src-supplier=Digi-Key, ComponentLink7Description=https://datasheet.ciiva.com/150/ccog-150517.pdf?src-supplier=Digi-Key, ComponentLink7URL=https://datasheet.ciiva.com/150/ccog-150517.pdf?src-supplier=Digi-Key, ComponentLink8Description=https://datasheet.ciiva.com/2987/ccog-2987653.pdf?src-supplier=Avnet, ComponentLink8URL=https://datasheet.ciiva.com/2987/ccog-2987653.pdf?src-supplier=Avnet, ComponentLink9Description=https://datasheet.ciiva.com/2987/ccog-2987654.pdf?src-supplier=Avnet, ComponentLink9URL=https://datasheet.ciiva.com/2987/ccog-2987654.pdf?src-supplier=Avnet, ComponentLink10Description=https://datasheet.ciiva.com/5423/ccog-243403-5423927.pdf?src-supplier=Mouser, ComponentLink10URL=https://datasheet.ciiva.com/5423/ccog-243403-5423927.pdf?src-supplier=Mouser, ComponentLink11Description=https://datasheet.ciiva.com/16218/ccog-16218185.pdf?src-supplier=Future+Electronics, ComponentLink11URL=https://datasheet.ciiva.com/16218/ccog-16218185.pdf?src-supplier=Future+Electronics, ComponentLink12Description=https://datasheet.ciiva.com/28592/759117-28592746.pdf?src-supplier=Element14, ComponentLink12URL=https://datasheet.ciiva.com/28592/759117-28592746.pdf?src-supplier=Element14, ComponentLink13Description=https://datasheet.ciiva.com/15165/getdatasheetpartid-38041-15165131.pdf?src-supplier=Verical, ComponentLink13URL=https://datasheet.ciiva.com/15165/getdatasheetpartid-38041-15165131.pdf?src-supplier=Verical, Contact Plating=Tin,Matte, Depth=0.5mm, Height=0.5mm, Lead Free="Lead Free", Length=1mm, Mount="Surface Mount", Number of Pins=2, Packaging="Tape and Reel", Pricing 1="1 = 0,10000, 10 = 0,03500, 100 = 0,01550, 500 = 0,01108, 1000 = 0,00871, 2500 = 0,00792, 5000 = 0,00729 (USD)", Radiation Hardening=No, REACH SVHC="No SVHC", RoHS=Yes, Stock 1=1489814, Supplier 1=Digi-Key, Termination=SMD/SMT, Thickness=0.022inch, Voltage Rating=50V, Voltage Rating (DC)=50V, Width=0.02inch
C390 C394 C431 C435 C658 C660 C662 C665 C666 C667 C668 C669 C670 C671 C673 C783 C785 C787 C789 C791 C792: library part Capacitor, Case/Package=0402, Case Code (Metric)=1005, Dielectric=X5R, Manufacturer=Multicomp, Manufacturer Part Number=MC0402X104K160CT, Max Operating Temperature=85°C, Min Operating Temperature=-55°C, Supplier Part Number 1=2310529, Tolerance=10%, Voltage Rating=16V, Capacitance=100nF, Case Code (Imperial)=0402, ComponentLink1Description=https://datasheet.ciiva.com/22648/1901289-22648380.pdf?src-supplier=Element14, ComponentLink1URL=https://datasheet.ciiva.com/22648/1901289-22648380.pdf?src-supplier=Element14, ComponentLink2Description=https://datasheet.ciiva.com/22648/1901289-22648381.pdf?src-supplier=Element14, ComponentLink2URL=https://datasheet.ciiva.com/22648/1901289-22648381.pdf?src-supplier=Element14, ComponentLink3Description=https://datasheet.ciiva.com/22686/1901289-22686271.pdf?src-supplier=Element14, ComponentLink3URL=https://datasheet.ciiva.com/22686/1901289-22686271.pdf?src-supplier=Element14, Number of Pins=2, Packaging="Cut Tape", REACH SVHC=Unknown, RoHS=Yes, Stock 1=510000, Supplier 1=Farnell, Voltage Rating (DC)=16V
C400 C401 C402 C403 C404 C405 C441 C442 C443 C444 C445 C446: library part Capacitor, "Cap Ceramic 10uF 25V X5R 10% SMD 1206 85C Embossed T/R", Case/Package=1206, Case Code (Metric)=3216, Dielectric=X5R, Manufacturer=Samsung, Manufacturer Part Number=CL31A106KAHNNNE, Max Operating Temperature=85°C, Min Operating Temperature=-55°C, Supplier Part Number 1=1276-1075-1-ND, Tolerance=10%, Voltage=25V, Capacitance=10uF, Case Code (Imperial)=1206, Category="Ceramic Capacitors", ComponentLink1Description=https://datasheet.ciiva.com/25710/cl31a106kahnnne-25710837.pdf?src-supplier=Digi-Key, ComponentLink1URL=https://datasheet.ciiva.com/25710/cl31a106kahnnne-25710837.pdf?src-supplier=Digi-Key, ComponentLink2Description=https://datasheet.ciiva.com/15195/getdatasheetpartid-355210-15195990.pdf?src-supplier=Verical, ComponentLink2URL=https://datasheet.ciiva.com/15195/getdatasheetpartid-355210-15195990.pdf?src-supplier=Verical, ComponentLink3Description=https://datasheet.ciiva.com/29201/452519-da-01-en-vs-kondensator-1206-29201124.pdf?src-supplier=Conrad, ComponentLink3URL=https://datasheet.ciiva.com/29201/452519-da-01-en-vs-kondensator-1206-29201124.pdf?src-supplier=Conrad, Contact Plating=Tin, Depth=1.6mm, Height=1.6mm, Lead Free="Lead Free", Length=3.2mm, Material=Ceramic, Mount="Surface Mount", Packaging="Tape and Reel", Pricing 1="1=0,22000, 10=0,15000, 100=0,07600, 500=0,05200, 1000=0,04600 (USD)", Radiation Hardening=No, RoHS=Yes, Stock 1=791813, Supplier 1=Digi-Key, Thickness=0.071inch, Voltage Rating=25V, Voltage Rating (DC)=25V, Width=0.063inch
C407 C419 C448 C460: library part Capacitor, Case/Package=0402, Case Code (Metric)=1005, Dielectric=X5R, Manufacturer=Samsung, Manufacturer Part Number=CL05A474KP5NNNC, Max Operating Temperature=85°C, Min Operating Temperature=-55°C, Supplier Part Number 1=1276-1173-1-ND, Tolerance=10%, Voltage Rating=10V, Capacitance=470nF, Case Code (Imperial)=0402, ComponentLink1Description=https://datasheet.ciiva.com/25710/cl05a474kp5nnnc-25710324.pdf?src-supplier=Digi-Key, ComponentLink1URL=https://datasheet.ciiva.com/25710/cl05a474kp5nnnc-25710324.pdf?src-supplier=Digi-Key, ComponentLink2Description=https://datasheet.ciiva.com/26838/getdatasheetpartid-355286-26838191.pdf?src-supplier=Verical, ComponentLink2URL=https://datasheet.ciiva.com/26838/getdatasheetpartid-355286-26838191.pdf?src-supplier=Verical, ComponentLink3Description=https://datasheet.ciiva.com/16437/cl05b104kq5nnnc-16437351.pdf?src-supplier=Future+Electronics, ComponentLink3URL=https://datasheet.ciiva.com/16437/cl05b104kq5nnnc-16437351.pdf?src-supplier=Future+Electronics, Depth=0.5mm, Height=0.5mm, Lead Free="Lead Free", Length=1mm, Mount="Surface Mount", Packaging="Tape and Reel", Pricing 1="1 = 0,10000, 10 = 0,07000, 100 = 0,03140, 500 = 0,02240, 1000 = 0,01761, 2500 = 0,01600, 5000 = 0,01472 (USD)", Radiation Hardening=No, RoHS=Yes, Stock 1=941442, Supplier 1=Digi-Key, Thickness=0.022inch, Voltage Rating (DC)=10V, Width=0.02inch
C409 C421 C450 C462 C515 C516 C523 C524 C539 C560 C563_5V_to_3V3_for_FTDI C564_5V_to_3V3_for_FTDI C565_5V_to_3V3_for_FTDI C659 C661: library part Capacitor, Case/Package=0603, Case Code (Metric)=1608, Dielectric=X5R, Manufacturer=Samsung, Manufacturer Part Number=CL10A475KP8NNNC, Max Operating Temperature=85°C, Min Operating Temperature=-55°C, Package Quantity=1, Supplier Part Number 1=1276-1044-1-ND, Tolerance=10%, Voltage Rating=10V, Capacitance=4.7uF, Case Code (Imperial)=0603, ComponentLink1Description=https://datasheet.ciiva.com/25797/cl10a475kp8nnnc-25797520.pdf?src-supplier=Digi-Key, ComponentLink1URL=https://datasheet.ciiva.com/25797/cl10a475kp8nnnc-25797520.pdf?src-supplier=Digi-Key, ComponentLink2Description=https://datasheet.ciiva.com/26838/getdatasheetpartid-358676-26838384.pdf?src-supplier=Verical, ComponentLink2URL=https://datasheet.ciiva.com/26838/getdatasheetpartid-358676-26838384.pdf?src-supplier=Verical, ComponentLink3Description=https://datasheet.ciiva.com/16318/cl05b104kq5nnnc-16318245.pdf?src-supplier=Future+Electronics, ComponentLink3URL=https://datasheet.ciiva.com/16318/cl05b104kq5nnnc-16318245.pdf?src-supplier=Future+Electronics, Contact Plating=Tin, Depth=0.8mm, Height=0.8mm, Length=1.6mm, Mount="Surface Mount", Packaging="Tape and Reel", Pricing 1="1 = 0,13000, 10 = 0,09600, 100 = 0,04520, 500 = 0,03168, 1000 = 0,02622 (USD)", Radiation Hardening=No, RoHS=Yes, Stock 1=2124648, Supplier 1=Digi-Key, Thickness=0.035inch, Width=0.031inch
C410 C412 C414 C416 C422 C424 C426 C428 C451 C453 C455 C457 C463 C465 C467 C469 C705 C709: library part Capacitor, Case/Package=0603, Case Code (Metric)=1608, Dielectric=X5R, Manufacturer=Murata, Manufacturer Part Number=GRM188R61A106KE69D, Max Operating Temperature=85°C, Min Operating Temperature=-55°C, Supplier Part Number 1=490-10474-1-ND, Tolerance=10%, Voltage=10V, Capacitance=10uF, Case Code (Imperial)=0603, ComponentLink1Description=http://components.arrow.com/part/dataview/0323_07281717?src-supplier=Arrow+Europe, ComponentLink1URL=http://components.arrow.com/part/dataview/0323_07281717?src-supplier=Arrow+Europe, ComponentLink2Description=http://www.farnell.com/datasheets/1955682.pdf?src-supplier=Farnell, ComponentLink2URL=http://www.farnell.com/datasheets/1955682.pdf?src-supplier=Farnell, ComponentLink3Description=http://www.mouser.com/ds/2/281/c02e-2905.pdf?src-supplier=Mouser, ComponentLink3URL=http://www.mouser.com/ds/2/281/c02e-2905.pdf?src-supplier=Mouser, ComponentLink4Description=http://search.murata.co.jp/Ceramy/image/img/A01X/G101/ENG/GRM188R61A106KE69-01.pdf?src-supplier=Digi-Key, ComponentLink4URL=http://search.murata.co.jp/Ceramy/image/img/A01X/G101/ENG/GRM188R61A106KE69-01.pdf?src-supplier=Digi-Key, ComponentLink5Description=http://www.farnell.com/datasheets/1955682.pdf?src-supplier=Element14, ComponentLink5URL=http://www.farnell.com/datasheets/1955682.pdf?src-supplier=Element14, ComponentLink6Description=http://www.farnell.com/datasheets/1955682.pdf?src-supplier=Newark, ComponentLink6URL=http://www.farnell.com/datasheets/1955682.pdf?src-supplier=Newark, ComponentLink7Description=http://psearch.en.murata.com/capacitor/product/GRM188R61A106KE69%23.pdf?src-supplier=Avnet, ComponentLink7URL=http://psearch.en.murata.com/capacitor/product/GRM188R61A106KE69%23.pdf?src-supplier=Avnet, Depth=0.8mm, Height=0.8mm, Lead Free="Lead Free", Length=1.6mm, Mount="Surface Mount", Packaging="Tape and Reel", Pricing 1="1 = 0,21000, 10 = 0,14000, 100 = 0,07110, 500 = 0,04864, 1000 = 0,04303 (USD)", REACH SVHC="No SVHC", RoHS=Yes, Stock 1=4597169, Supplier 1=Digi-Key, Thickness=0.037inch, Voltage Rating=10V, Voltage Rating (DC)=10V, Width=0.031inch
C411 C413 C415 C417 C423 C425 C427 C429 C452 C454 C456 C458 C464 C466 C468 C470: library part Capacitor, Case/Package=0603, Case Code (Metric)=1608, Dielectric=X5R, Manufacturer=Murata, Manufacturer Part Number=GRM188R61A226ME15D, Max Operating Temperature=85°C, Min Operating Temperature=-55°C, Package Quantity=4000, Supplier Part Number 1=490-10476-1-ND, Tolerance=20%, Voltage Rating=10V, Capacitance=22uF, Case Code (Imperial)=0603, ComponentLink1Description=https://datasheet.ciiva.com/46444/1769893-46444975.pdf?src-supplier=Element14, ComponentLink1URL=https://datasheet.ciiva.com/46444/1769893-46444975.pdf?src-supplier=Element14, Depth=0.8mm, Height=0.8mm, Lead Free="Lead Free", Length=1.6mm, Material=Ceramic, Mount="Surface Mount", Packaging="Tape and Reel", Pricing 1="1 = 0,31000, 10 = 0,21500, 100 = 0,12160, 500 = 0,08584, 1000 = 0,07512 (USD)", REACH SVHC="No SVHC", RoHS=Yes, Stock 1=1768748, Supplier 1=Digi-Key, Termination=SMD/SMT, Thickness=0.039inch, Voltage Rating (DC)=10V, Weight=0.000222oz, Width=0.8mm